# Altium PCB MR_TRANS.PcbDoc
Units mil, origin at the board's own origin, x right, y up, seen from the top; angles counter-clockwise.
Board outline 1582.71 x 1582.71 mil, 2 copper layers (Top Layer, Bottom Layer), stack 37.008 mil thick; 14 components, 9 nets, 68 pads, 20 vias.
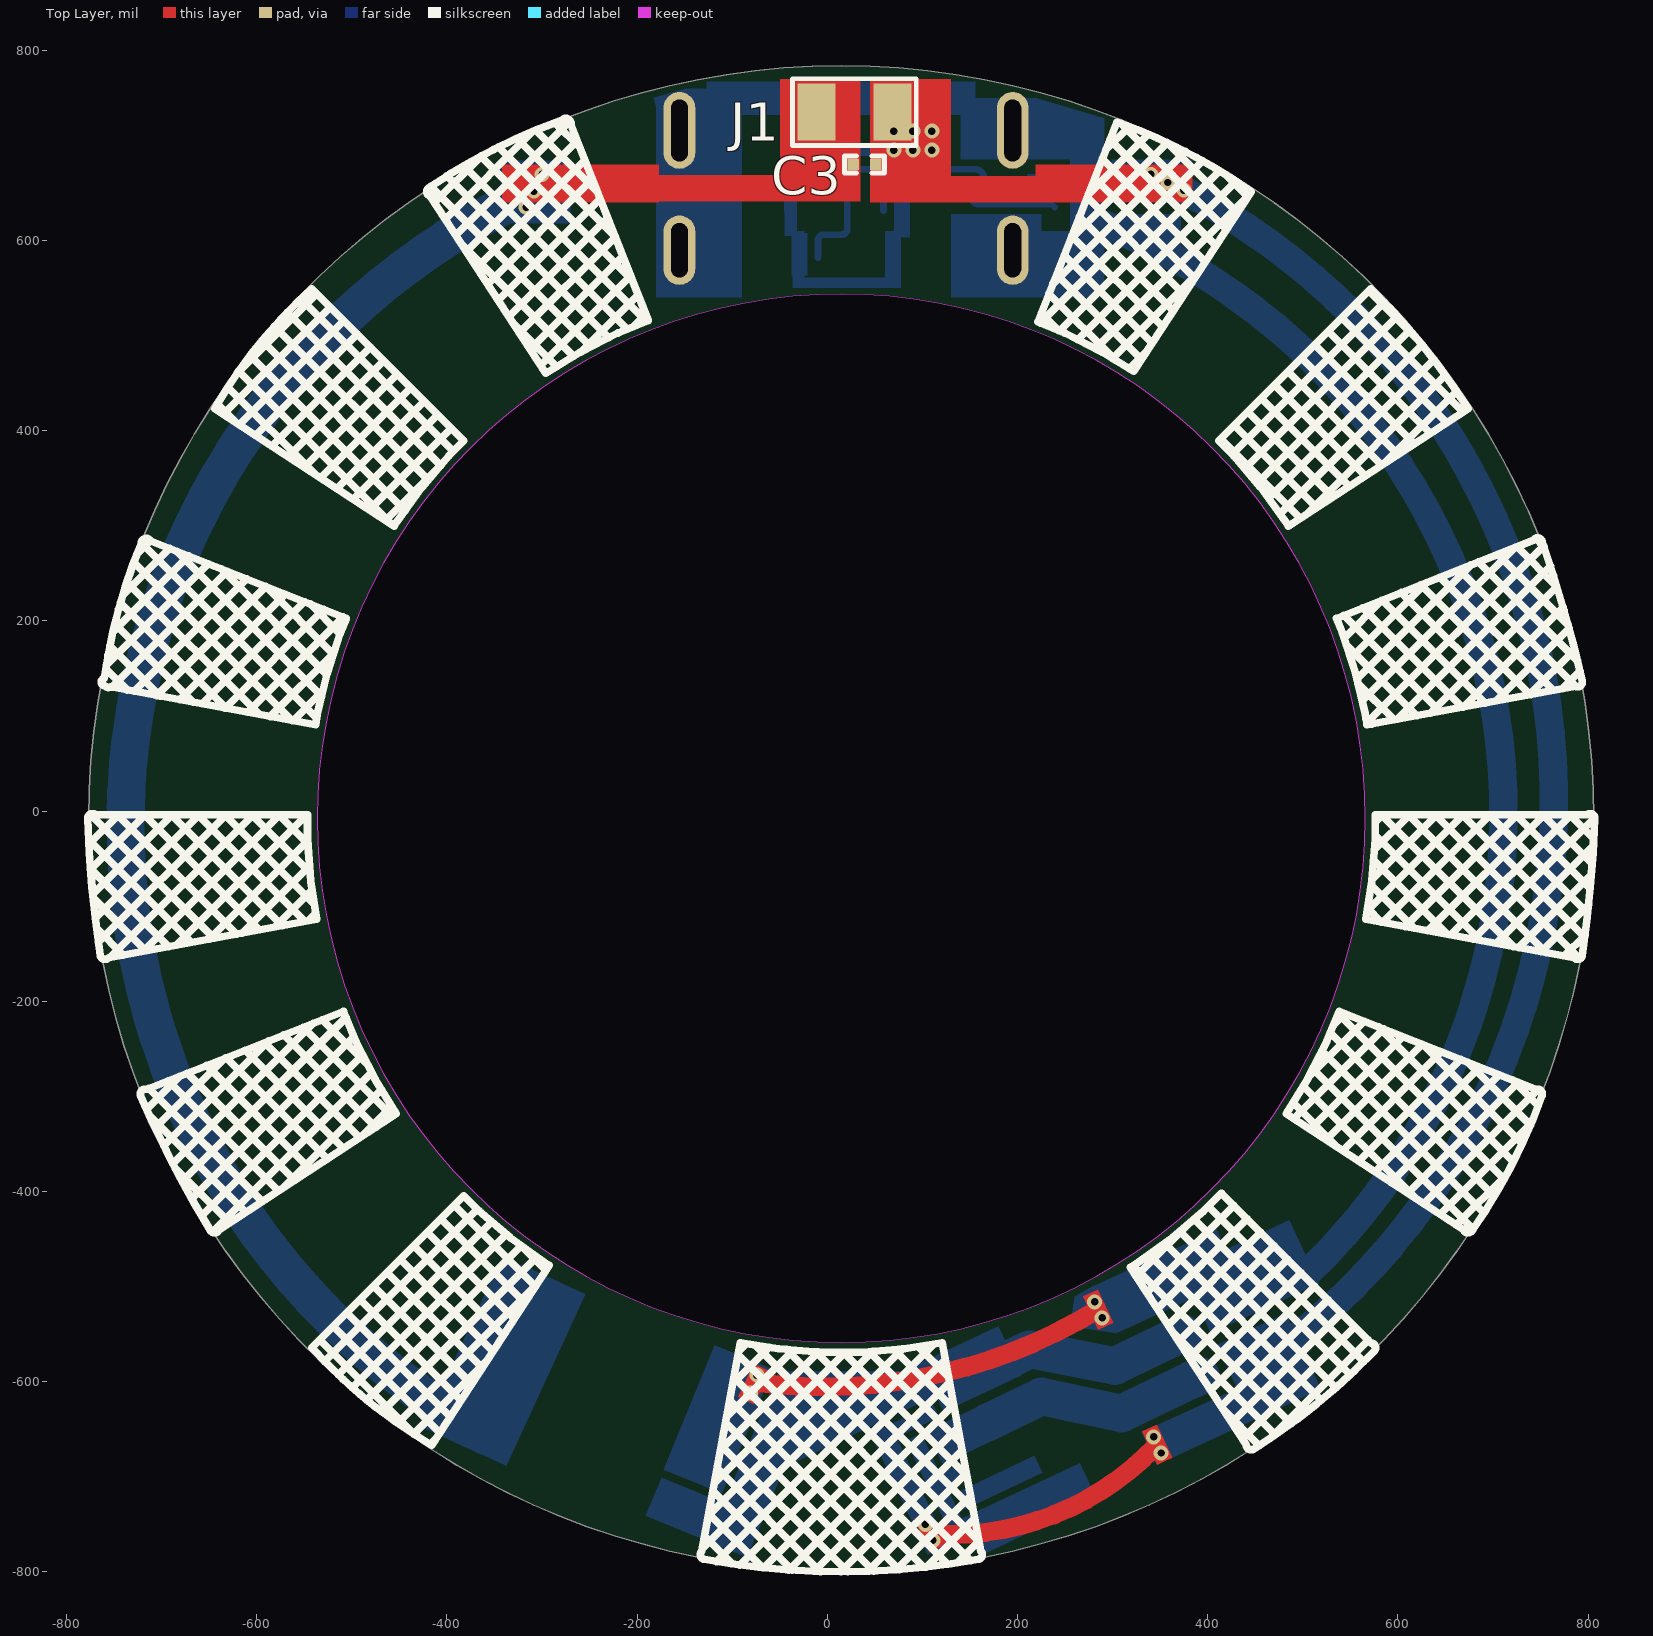
[diagram p0: Top Layer view]
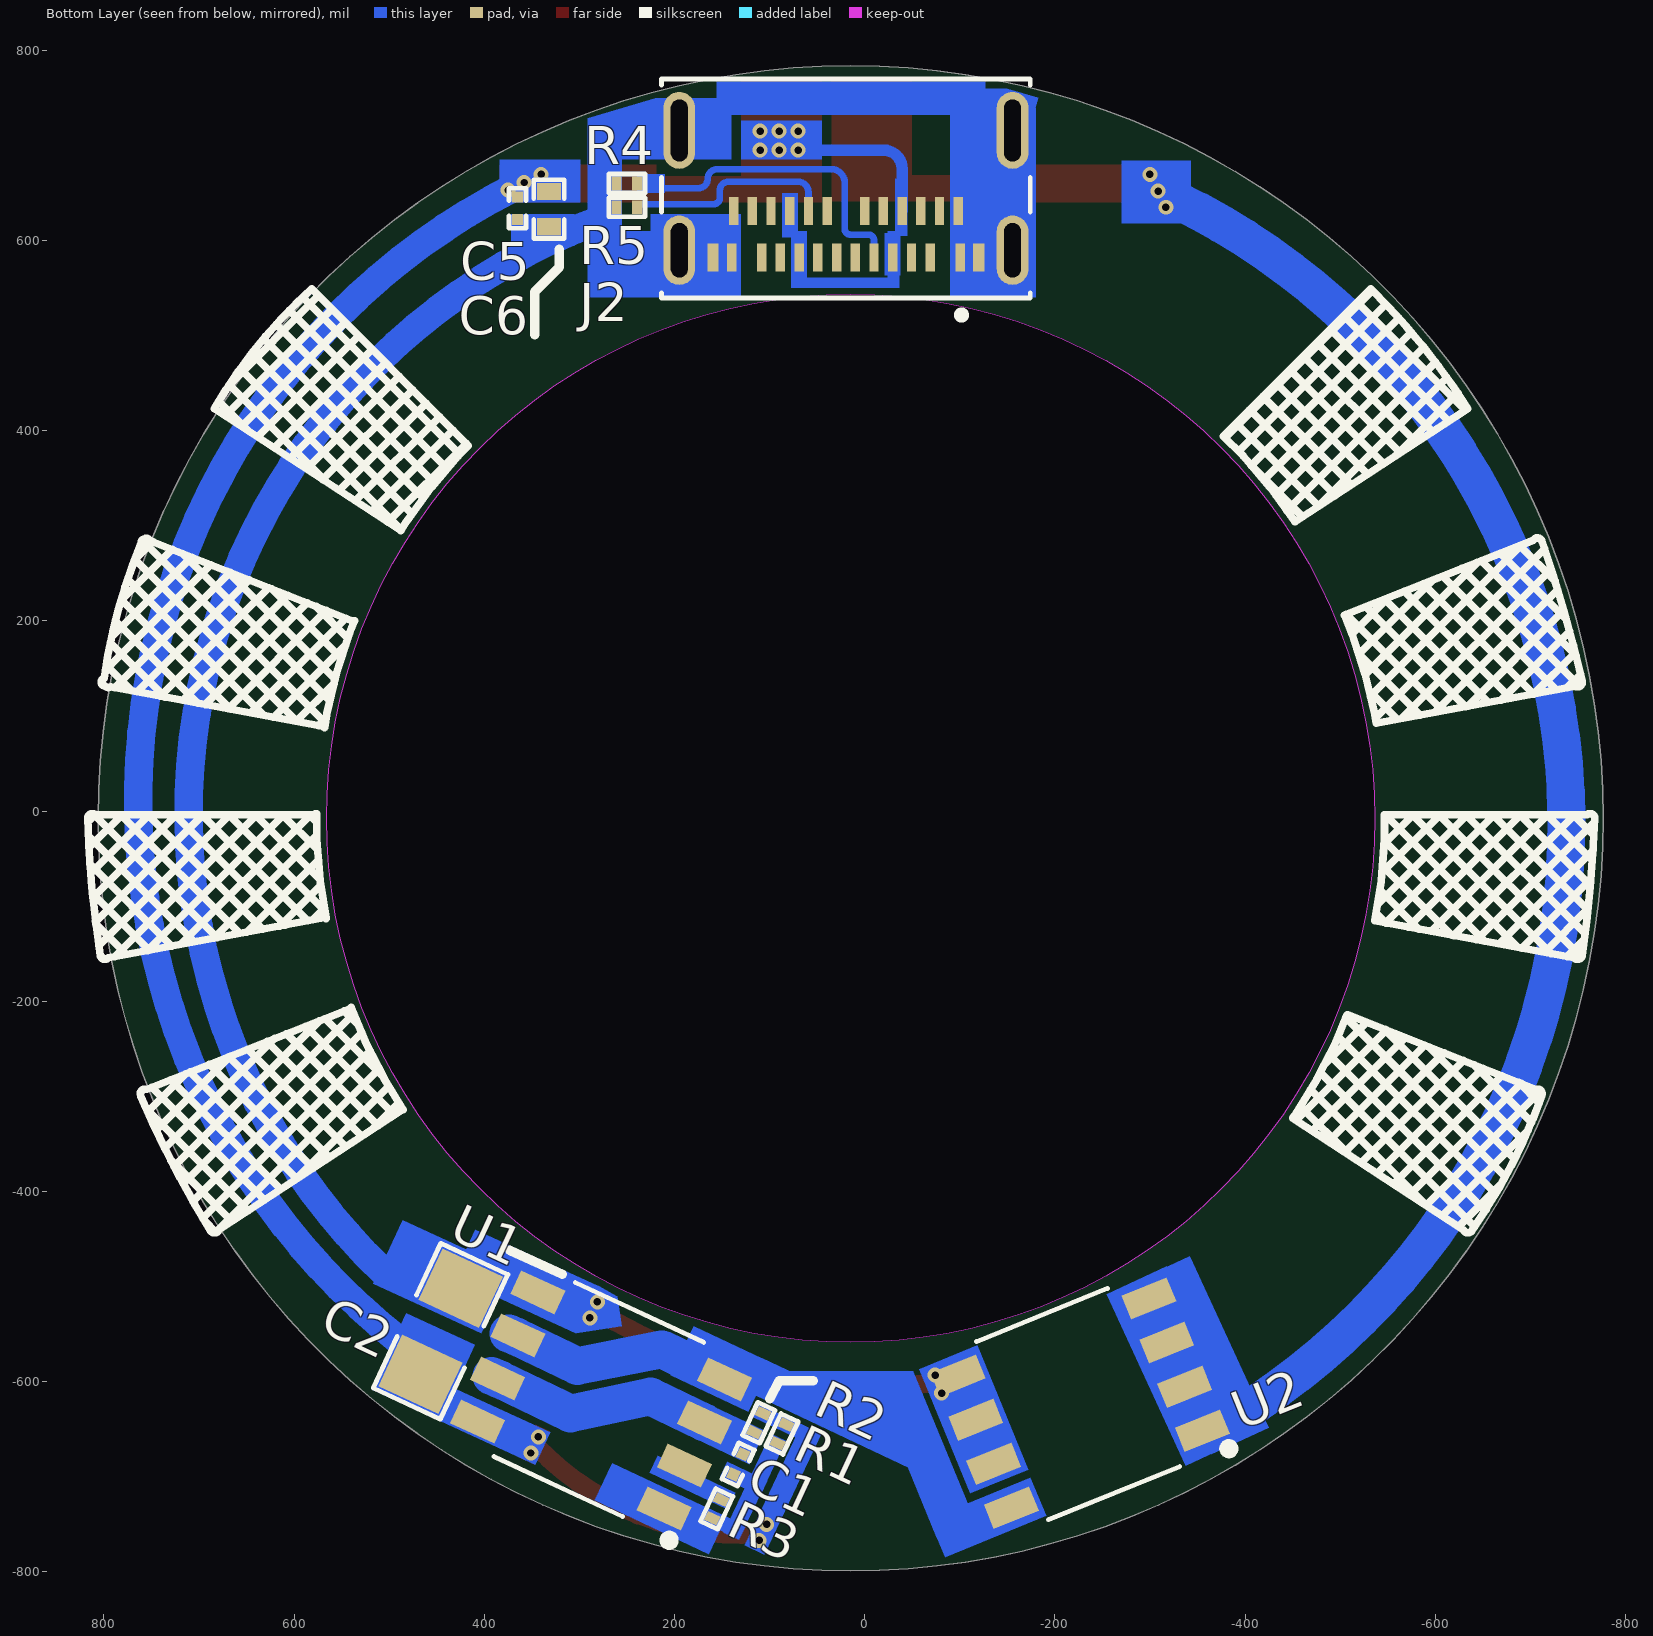
[diagram p1: Bottom Layer view, seen from below]
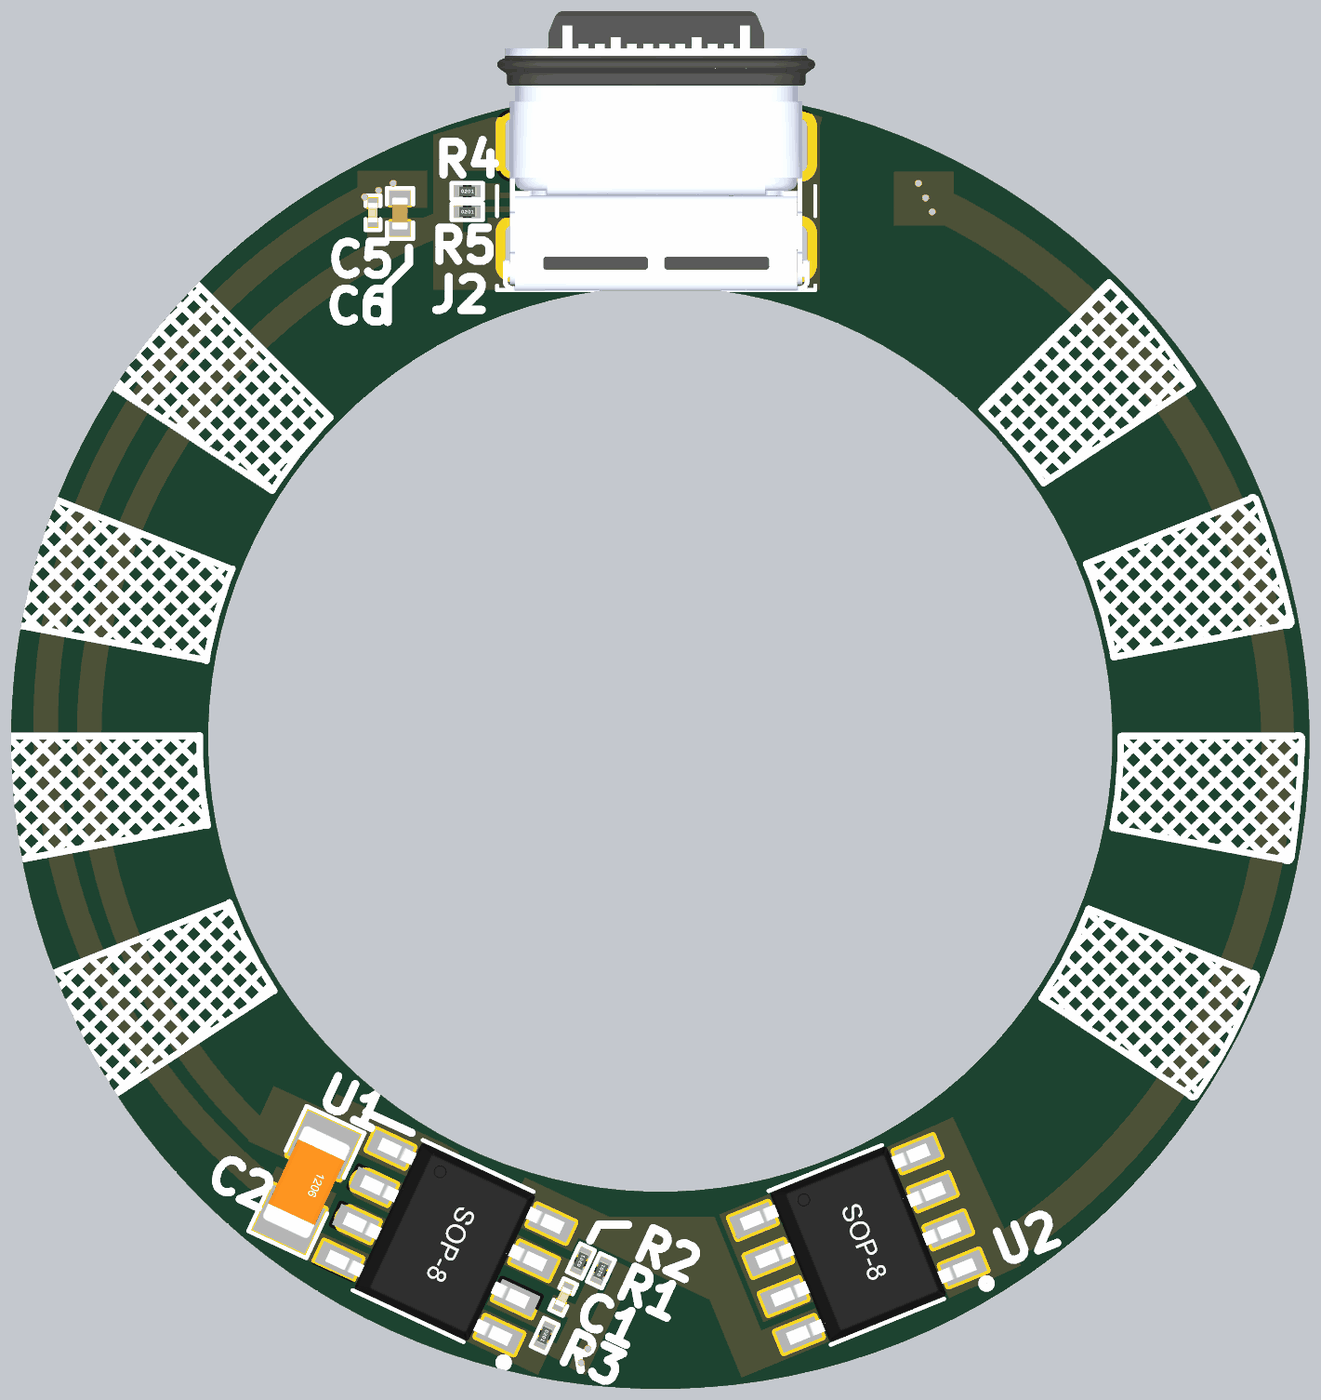
[diagram p2: 3D render of the assembled board from below, using the file's embedded part models]

## Layer stack, top to bottom
Top Solder: solder mask 1.1811, Solder Resist, Dk 3.5
Top Layer: signal copper 3.5433
Dielectric 1: dielectric 29.9213, FR-4, Dk 4.8
Bottom Layer: signal copper 3.5433
Bottom Solder: solder mask 1.1811, Solder Resist, Dk 3.5

## Board outline
-776.64,-7.6 ccw(c14.71,-7.6) 14.71,-798.95 ccw(c14.71,-7.6) 806.06,-7.6 ccw(c14.71,-7.6) 14.71,783.76 ccw(c14.71,-7.6)
cut-out: -536.47,-7.6 ccw(c14.71,-7.6) 14.71,-558.78 ccw(c14.71,-7.6) 565.89,-7.6 ccw(c14.71,-7.6) 14.71,543.58 ccw(c14.71,-7.6)

## Design rules (kind name [scope] priority, off if disabled: settings)
Clearance [All] p1: gap=6 ignorepadtopadclearanceinfootprint=FALSE
MinimumSolderMaskSliver [All] p1: minsoldermaskwidth=0
PolygonConnect [All] p1: connectstyle=Direct reliefconductorwidth=10 reliefentries=4 polygonreliefangle="90 Angle" airgapwidth=10
RoutingVias [All] p1: holewidth=7.87 width=15.75 viastyle="Through Hole" minholewidth=7.87 minwidth=15.75 maxholewidth=28 maxwidth=50
SilkToSilkClearance [All] p1: silktosilkclearance=0
SilkToSolderMaskClearance [IsPad] p1: minsilkscreentomaskgap=0 clearancetoexposedcopper=TRUE
SolderMaskExpansion [All] p1: expansion=4
Width [All] p1: maxlimit=40 minlimit=7 preferedwidth=10
27 further rules are at their usual default settings.

## Classes and differential pairs
component class "U_Wireless Transmitter Section": C1 C2 C3 R1 R2 R3 U1 U2
component class "U_Connector Section": C5 C6 J1 J2 R4 R5

## Components (designator, comment, footprint, x,y, rotation, side; value= is the part's Value field where it differs from the comment)
C1 "120pF" "CAP 0201" 133,-687 r295 bottom
C2 "47uF" Cap1206 446,-547 r295 bottom
C3 "15nF" "CAP 0201" 39,680 r180 top
C5 "0.1uF" "CAP 0201" 365,634 r270 bottom
C6 "1uF" Cap0402 332,633 r90 bottom
J1 "SMD PADS" "SMD PAD" 28.37,735 r180 top
J2 "2305018-2" 2305018-2 19.69,648.85 r0 bottom locked
R1 "47K" Res-0201 87,-655 r115 bottom
R2 "47K" Res-0201 111.42,-643.19 r115 bottom
R3 "9.1K" Res-0201 155.58,-733.81 r295 bottom
R4 "5.23k" Res-0201 250,660 r180 bottom
R5 "5.23k" Res-0201 250,635 r180 bottom
U1 "XKT-412" SOP-8 277.18,-619.78 r25 bottom locked value=Custom
U2 "XKT-335" SOP-8 -226.63,-622.59 r338 bottom value=Custom

## Footprints (in the part's own frame and the unit in brackets; to place one, negate y for a bottom-side part, rotate by r counter-clockwise, add the part's x,y. Pads: shape width x height; smd on the part's side, far side on the other; paste and mask are expansions set on the pad)
2305018-2 [mm] "CONN RCP USB3.1 TYPEC 24P SMD RA"
  rect 0.25x0.75 smd: A1(-3.05,1.7) A2(-2.25,1.7) A3(-1.75,1.7) A4(-1.25,1.7) A5(-0.75,1.7) A6(-0.25,1.7) A7(0.25,1.7) A8(0.75,1.7) A9(1.25,1.7) A10(1.75,1.7) A11(2.25,1.7) A12(3.05,1.7) B1(3,0.45) B2(2.5,0.45) B3(2,0.45) B4(1.5,0.45) B5(1,0.45) B6(0.5,0.45) B7(-0.5,0.45) B8(-1,0.45) B9(-1.5,0.45) B10(-2,0.45) B11(-2.5,0.45) B12(-3,0.45)
  rect 0.3x0.75 smd: G1(-3.55,1.7) G2(3.55,1.7)
  oval 0.85x2.05 hole 0.45 slot 1.65 at 90 deg: S1(-4.45,-1.7) S2(4.45,-1.7)
  oval 0.85x1.85 hole 0.45 slot 1.45 at 90 deg: S3(4.45,1.5) S4(-4.45,1.5)
  silkscreen extent -4.92,-3.07 4.92,3.33, body extent -4.92,-5.86 4.92,2.79, height 3.53
Cap0402 [mil]
  rect 18x25 smd mask+2.36: 1(-18.5,0) 2(18.5,0)
  silkscreen extent -31,-16 31,16, body extent -20,-10 20,10, height 19
Cap1206 [mil] "SMD 1206"
  rect 60x70 smd: 1(-50,0) 2(50,0)
  silkscreen extent -84,-39 84,39, body extent -63,-31 63,32, height 39
"CAP 0201" [mm]
  rect 0.3x0.3 smd mask+0.055: 1(-0.3,0) 2(0.3,0)
  silkscreen extent -0.53,-0.23 0.53,0.23, body extent -0.3,-0.15 0.3,0.15, height 0.28
Res-0201 [mm]
  rect 0.27x0.37 smd: 1(-0.275,0) 2(0.275,0)
  silkscreen extent -0.48,-0.25 0.48,0.25, body extent -0.3,-0.15 0.3,0.15, height 0.29
"SMD PAD" [mil] "SMD 0805"
  rect 40x60 smd: 1(-40,0) 2(40,0)
  silkscreen extent -65,-35 65,35
SOP-8 [mm]
  rect 1.3x0.7 smd: 1(-2.75,1.905) 2(-2.75,0.635) 3(-2.75,-0.635) 4(-2.75,-1.905) 5(2.75,-1.905) 6(2.75,-0.635) 7(2.75,0.635) 8(2.75,1.905)
  silkscreen extent -3.36,-2.57 1.96,2.75, body extent -3.11,-2.5 3.11,2.5, height 1.87

## Part data
C1: library part GRM0335C1H121JA01D, "CAP CER 120PF 50V C0G/NP0 0201", Case Code (Imperial)=0201, Case Code (Metric)=0603, Dielectric=C0G, MANUFACTURER=Murata, Max Operating Temperature=125°C, Min Operating Temperature=-55°C, Package Quantity=15000, Supplier Part Number 1=490-7221-1-ND, Tolerance=5%, Voltage Rating=50V, Capacitance=120pF, Case/Package=0201, Category="Ceramic Capacitors", ComponentLink1Description=https://datasheet.ciiva.com/18699/grm0335c1h121ja01-01-18699256.pdf?src-supplier=Digi-Key, ComponentLink1URL=https://datasheet.ciiva.com/18699/grm0335c1h121ja01-01-18699256.pdf?src-supplier=Digi-Key, ComponentLink2Description=https://datasheet.ciiva.com/24220/c02e-24220870.pdf?src-supplier=Mouser, ComponentLink2URL=https://datasheet.ciiva.com/24220/c02e-24220870.pdf?src-supplier=Mouser, ComponentLink3Description=https://datasheet.ciiva.com/18699/partnumbering-e-01-18699257.pdf?src-supplier=Digi-Key, ComponentLink3URL=https://datasheet.ciiva.com/18699/partnumbering-e-01-18699257.pdf?src-supplier=Digi-Key, ComponentLink4Description=https://datasheet.ciiva.com/18699/partnumbering-e-01-18699258.pdf?src-supplier=Digi-Key, ComponentLink4URL=https://datasheet.ciiva.com/18699/partnumbering-e-01-18699258.pdf?src-supplier=Digi-Key, Height=0.3mm, Lead Free="Lead Free", Length=0.024inch, Manufacturer Part Number=GRM0335C1H121JA01D, Mount="Surface Mount", Packaging="Tape and Reel", Pricing 1="1=0.10000, 10=0.02300, 50=0.01260, 100=0.01020, 500=0.00732, 1000=0.00575, 2500=0.00522, 5000=0.00481 (USD)", RoHS=Yes, RoHS Compliant=Yes, Stock 1=655537, Supplier 1=Digi-Key, Termination=SMD/SMT, Thickness=0.013inch, Voltage Rating (DC)=50V, Weight=1.2E-05oz, Width=0.3mm
C2: library part EMK316BBJ476ML-T, "CAP CER 47UF 16V X5R 1206", Case Code (Imperial)=1206, Case Code (Metric)=3216, MANUFACTURER="Taiyo Yuden", Max Operating Temperature=85°C, Min Operating Temperature=-55°C, Supplier Part Number 1=587-5425-1-ND, Tolerance=20%, Voltage Rating=16V, Capacitance=47uF, Case/Package=1206, Category="Ceramic Capacitors", ComponentLink1Description=http://www.farnell.com/datasheets/2819853.pdf?src-supplier=Farnell, ComponentLink1URL=http://www.farnell.com/datasheets/2819853.pdf?src-supplier=Farnell, ComponentLink2Description=http://ds.yuden.co.jp/TYCOMPAS/ut/detail.do?productNo=EMK316BBJ476ML-T&fileName=EMK316BBJ476ML-T_SS&mode=specSheetDownload&src-supplier=Digi-Key, ComponentLink2URL=http://ds.yuden.co.jp/TYCOMPAS/ut/detail.do?productNo=EMK316BBJ476ML-T&fileName=EMK316BBJ476ML-T_SS&mode=specSheetDownload&src-supplier=Digi-Key, ComponentLink3Description=http://www.farnell.com/datasheets/2819853.pdf?src-supplier=Element14, ComponentLink3URL=http://www.farnell.com/datasheets/2819853.pdf?src-supplier=Element14, ComponentLink4Description=http://www.farnell.com/datasheets/2819853.pdf?src-supplier=Newark, ComponentLink4URL=http://www.farnell.com/datasheets/2819853.pdf?src-supplier=Newark, Manufacturer Part Number=EMK316BBJ476ML-T, Mount="Surface Mount", Packaging="Tape and Reel", Pricing 1="1=0.70000, 10=0.51700, 50=0.41400, 100=0.35480, 500=0.28090, 1000=0.23654 (USD)", RoHS=Yes, RoHS Compliant=Yes, Stock 1=201307, Supplier 1=Digi-Key
C3: library part CC0201KRX7R8BB152, "CAP CER 1500PF 25V X7R 0201", Capacitance=1.5nF, Case/Package=0201, Case Code (Metric)=0603, Dielectric=X7R, MANUFACTURER=Yageo, Max Operating Temperature=125°C, Min Operating Temperature=-55°C, Supplier Part Number 1=311-1607-1-ND, Tolerance=10%, Voltage Rating=25V, Case Code (Imperial)=0201, Category="Ceramic Capacitors", ComponentLink1Description=http://www.yageo.com/documents/recent/UPY-GPHC_X7R_6.3V-to-50V_18.pdf?src-supplier=Digi-Key, ComponentLink1URL=http://www.yageo.com/documents/recent/UPY-GPHC_X7R_6.3V-to-50V_18.pdf?src-supplier=Digi-Key, Halogen Free="Halogen Free", Lead Free="Lead Free", Length=0.024inch, Manufacturer Part Number=CC0201KRX7R8BB152, Mount="Surface Mount", Packaging="Tape and Reel", Pricing 1="1=0.10000, 10=0.02400, 50=0.01320, 100=0.01080, 500=0.00770, 1000=0.00605, 2500=0.00550, 5000=0.00506 (USD)", RoHS=Yes, RoHS Compliant=Yes, Stock 1=17556, Supplier 1=Digi-Key, Thickness=0.013inch, Voltage Rating (DC)=25V, Width=0.012inch
C5: library part GRM033R6YA104ME14D, "CAP CER 0.1UF 35V X5R 0201", Capacitance=100nF, Case Code (Imperial)=0201, Case Code (Metric)=0603, Dielectric=X5R, MANUFACTURER=Murata, Max Operating Temperature=85°C, Min Operating Temperature=-55°C, Package Quantity=15000, Supplier Part Number 1=490-10431-1-ND, Tolerance=20%, Voltage Rating=35V, Case/Package=0201, Category="Ceramic Capacitors", ComponentLink1Description=http://www.mouser.com/ds/2/281/c02e-2905.pdf?src-supplier=Mouser, ComponentLink1URL=http://www.mouser.com/ds/2/281/c02e-2905.pdf?src-supplier=Mouser, ComponentLink2Description=http://search.murata.co.jp/Ceramy/image/img/A01X/G101/ENG/GRM033R6YA104ME14-01.pdf?src-supplier=Digi-Key, ComponentLink2URL=http://search.murata.co.jp/Ceramy/image/img/A01X/G101/ENG/GRM033R6YA104ME14-01.pdf?src-supplier=Digi-Key, Height=0.3mm, Length=0.024inch, Manufacturer Part Number=GRM033R6YA104ME14D, Mount="Surface Mount", Packaging="Tape and Reel", Pricing 1="1=0.10000, 10=0.05600, 50=0.03040, 100=0.02490, 500=0.01778, 1000=0.01398, 2500=0.01270, 5000=0.01169 (USD)", RoHS=Yes, Stock 1=49800, Supplier 1=Digi-Key, Termination=SMD/SMT, Thickness=0.013inch, Voltage Rating (DC)=35V, Weight=1.2E-05oz, Width=0.012inch
C6: library part CC0402KRX5R6BB105, "CAP CER 1UF 10V X5R 0402", Case Code (Imperial)=0402, Case Code (Metric)=1005, Dielectric=X5R, MANUFACTURER=Yageo, Max Operating Temperature=85°C, Min Operating Temperature=-55°C, Package Quantity=1, Resistor Type=Ceramic, Supplier Part Number 1=311-1439-1-ND, Tolerance=10%, Voltage Rating=10V, Capacitance=1uF, Case/Package=0402, Category="Ceramic Capacitors", ComponentLink1Description=https://datasheet.ciiva.com/176/upy-gphc-x5r-4v-to-50v-12-176704.pdf?src-supplier=Digi-Key, ComponentLink1URL=https://datasheet.ciiva.com/176/upy-gphc-x5r-4v-to-50v-12-176704.pdf?src-supplier=Digi-Key, ComponentLink2Description=https://datasheet.ciiva.com/176/mlccorderingcode-176705.pdf?src-supplier=Digi-Key, ComponentLink2URL=https://datasheet.ciiva.com/176/mlccorderingcode-176705.pdf?src-supplier=Digi-Key, ComponentLink3Description=https://datasheet.ciiva.com/176/mlccorderingcode-176706.pdf?src-supplier=Digi-Key, ComponentLink3URL=https://datasheet.ciiva.com/176/mlccorderingcode-176706.pdf?src-supplier=Digi-Key, Construction=Flat, Depth=0.5mm, Dissipation Factor=15%, Halogen Free="Halogen Free", Height=0.5mm, Lead Free="Lead Free", Length=1mm, Manufacturer Part Number=CC0402KRX5R6BB105, Mount="Surface Mount", Number of Pins=2, Packaging="Tape and Reel", Pricing 1="1=0.11000, 10=0.08000, 50=0.04560, 100=0.03770, 500=0.02644, 1000=0.02189, 2500=0.02037, 5000=0.01864 (USD)", Radiation Hardening=No, REACH SVHC="No SVHC", RoHS=Yes, RoHS Compliant=Yes, Series=CC, Stock 1=3784314, Supplier 1=Digi-Key, Termination=SMD/SMT, Thickness=0.022inch, Voltage Rating (DC)=10V, Width=0.02inch
J1: library part "SMD PAD"
J2: "CONN RCP USB3.1 TYPEC 24P SMD RA"
R1 R2: library part ERJ-1GNJ473C, "RES SMD 47K OHM 5% 1/20W 0201", Case Code (Imperial)=0201, Case Code (Metric)=0603, MANUFACTURER=Panasonic, Max Operating Temperature=125°C, Max Power Dissipation=50mW, Min Operating Temperature=-55°C, Package Quantity=15000, Resistance=47kR, Resistor Type="Thick Film", Supplier Part Number 1=P123333CT-ND, Temperature Coefficient=200ppm/°C, Tolerance=5%, Voltage Rating=25V, Case/Package=0201, Category="Chip SMD Resistors", ComponentLink1Description=https://datasheet.ciiva.com/24066/aoa0000ce1-37422-24066854.pdf?src-supplier=Mouser, ComponentLink1URL=https://datasheet.ciiva.com/24066/aoa0000ce1-37422-24066854.pdf?src-supplier=Mouser, Height=0.01inch, Length=0.024inch, Manufacturer Part Number=ERJ-1GNJ473C, Mount="Surface Mount", Number of Terminations=2, Packaging="Tape and Reel", Power Rating=50mW, Pricing 1="1=0.10000, 10=0.02500, 100=0.01000, 1000=0.00450, 2500=0.00391, 5000=0.00323 (USD)", RoHS=Yes, RoHS Compliant=Yes, Stock 1=79259, Supplier 1=Digi-Key, Termination=SMD/SMT, Width=0.3mm
R3: library part RC0201JR-079K1L, "RES SMD 9.1K OHM 5% 1/20W 0201", Case/Package=0201, Case Code (Metric)=0603, MANUFACTURER=Yageo, Max Operating Temperature=125°C, Max Power Dissipation=50mW, Min Operating Temperature=-55°C, Resistance=9.1kR, Resistor Type="Thick Film", Supplier Part Number 1=YAG2941CT-ND, Temperature Coefficient=200ppm/°C, Tolerance=5%, Working Voltage=25V, Case Code (Imperial)=0201, Category="Chip SMD Resistors", ComponentLink1Description=http://www.yageo.com/documents/recent/PYu-RC_Group_51_RoHS_L_9.pdf?src-supplier=Digi-Key, ComponentLink1URL=http://www.yageo.com/documents/recent/PYu-RC_Group_51_RoHS_L_9.pdf?src-supplier=Digi-Key, ComponentLink2Description=http://www.yageo.com.tw/exep/pages/download/literatures/PYu-R_INT-thick_7.pdf?src-supplier=Digi-Key, ComponentLink2URL=http://www.yageo.com.tw/exep/pages/download/literatures/PYu-R_INT-thick_7.pdf?src-supplier=Digi-Key, ComponentLink3Description=http://www.yageo.com/documents/recent/PYu-RC_Group_51_RoHS_L_8.pdf?src-supplier=Future+Electronics, ComponentLink3URL=http://www.yageo.com/documents/recent/PYu-RC_Group_51_RoHS_L_8.pdf?src-supplier=Future+Electronics, Features="Moisture Resistant", Height=0.01inch, Lead Free="Lead Free", Length=0.024inch, Manufacturer Part Number=RC0201JR-079K1L, Number of Terminations=2, Packaging="Tape and Reel", Power Rating=50mW, Pricing 1="1=0.10000, 10=0.02800, 100=0.01140, 1000=0.00513, 2500=0.00445, 5000=0.00368 (USD)", RoHS=Yes, Stock 1=4033, Supplier 1=Digi-Key, Width=0.012inch
R4 R5: library part RTT015231FTH, "5.23kO ±1% 0.05W 0201 Chip Resistor - Surface Mount RoHS", MANUFACTURER=Ralec, Package=0201, Manufacturer Part No=RTT015231FTH
U1: "1.5AUSB power chip wireless wireless charging power", MANUFACTURER=ReYeBu, Package=SOP-8, Manufacturer Part No=XKT-412
U2: "high current wireless power charging power wireless IC chip", MANUFACTURER=ReYeBu, Manufacturer Part No=XKT-335, Pakage=SOP-8

## Via types
v1: diameter 15.75, hole 7.87, Top Layer to Bottom Layer, tented both sides, 20 vias

## Nets (pads, with @x,y where several pads share a name; then routed paths per layer and width w, separated by ;. In a path a pad name is that pad's centre, name@x,y a point inside that pad or via, vN(x,y) a via of type N, cw(c..) or ccw(c..) an arc to the next point about the centre after c; other vN are vias at no path point)
12V: C2.2 C3.1 C5.1 C6.2 J1.1 J2.A4 J2.A9 J2.B4 J2.B9 R1.2 R2.2 U1.8 | length 1980.1
  Top Layer w20: v1@110.92,-760.4 ccw(c127.96,-460.44) 345.11,-668.06
  Bottom Layer w12: J2.B9 -39.37,675.63 cw(c-20,675.63) -20,695 v1(90,695) ccw(c90,710) v1@105,710
  Bottom Layer w30: v1(340.3,669.67) cw(c40,10.87) C2.2@464,-576
  other v1: 111,-767 103,-750 351,-675 343,-658 375,653 358,661 70,695 110,695 70,715 90,715 110,715
CC1: J2.A5 R4.2 | length 329.4
  Bottom Layer w7: J2.A5 -9.84,600.16 cw(c-3.82,600.16) -3.82,606.18 15,606.18 ccw(c15,612.21) 21.02,612.21 21.02,661.02 cw(c35,661.02) 35,675 155,675 cw(c155,665) 165,665 ccw(c175,665) 175,655 219.17,655 224.17,660
CC2: J2.B5 R5.2 | length 224.2
  Bottom Layer w7: J2.B5 59.06,650.87 cw(c70,650.87) 70,661.81 143.19,661.81 cw(c143.19,652.78) 152.22,652.78 152.22,645 ccw(c159.03,645) 159.03,638.19 235.98,638.19 R5.2
FT: R3.1 U1.2
GND: C2.1 C5.2 C6.1 J2.A1 J2.A12 J2.B1 J2.B12 J2.G1 J2.G2 J2.S1 J2.S2 J2.S3 J2.S4 R4.1 R5.1 U1.5 U2.5 U2.6 U2.7 | length 1722.1
  Top Layer w20: -75,-601 ccw(c-4.34,-52.66) 283,-525
  Bottom Layer w30: 278,622 cw(c43.27,-3.11) 504.24,-486.2
  other v1: -81,-612 -74,-593 289,-533 281,-516
IND: C3.2 J1.2 U2.1 U2.2 U2.3 U2.4 | length 1602.3
  Bottom Layer w40: -384.43,-640.68 cw(c-6.58,-14.35) -297,657
  other v1: -316.67,634.97 -308.67,651.97 -300,669.67
OUT: U1.4 U1.6 U2.8 | length 246
  Bottom Layer w40: U1.4 213,-566 302.05,-583.57 365.54,-553.03 U1.6@367.69,-552 ; U1.6@365.41,-552.96 U1.6@374.25,-549.23
TD: C1.1 R2.1 U1.3 U1.7 | length 241.1
  Bottom Layer w40: U1.3 225.31,-615.56 309.25,-633.53 U1.7@383.72,-597.72 ; U1.7@383.59,-597.65 U1.7 U1.7@392.43,-593.91
VD: C1.2 R1.1 R3.2 U1.1
pads on no net: J2.A2 J2.A3 J2.A6 J2.A7 J2.A8 J2.A10 J2.A11 J2.B2 J2.B3 J2.B6 J2.B7 J2.B8 J2.B10 J2.B11

## Polygon pours and split planes (outlines as drawn)
no net on Top Layer "Top Layer-No Net" (solid, pour order 3): -327,702
no net on Top Overlay (hatched 45Degree grid 20 track 8): -644.34,423.28 -446.63,294.01 cw(c-57.43,51) -375.04,382.14 -542.07,549.18 ccw(c-191.53,159.94)
no net on Top Overlay (hatched 45Degree grid 20 track 8): 217.59,504.88 cw(c116.04,188) 316.32,453.74 445.58,651.45 ccw(c111.16,178.58) 304.55,724.52
no net on Top Overlay (hatched 45Degree grid 20 track 8): 404.45,382.15 cw(c202.64,145.06) 476.04,294.01 673.76,423.28 ccw(c77.35,43.29) 571.48,549.18
no net on Top Overlay (hatched 45Degree grid 20 track 8): 541.16,92.92 ccw(c400.61,118.75) 543.52,118.75 ccw(c400.61,118.75) 522.9,192.7 cw(c527.19,195.29) 528.61,200.1 742.5,284.78 cw(c746.82,282.24) 751.56,283.88 cw(c-604.69,-185.69) 793.85,136.8 cw(c788.97,135.68) 793.98,135.68 cw(c788.97,135.68) 786.65,131.23 557.41,88.81 cw(c556.69,92.69) 554.33,89.52 549.85,88.69 cw(c546.1,92.02)
no net on Top Overlay (hatched 45Degree grid 20 track 8): 551.82,-106.69 ccw(c556.69,-107.89) 559.01,-112.34 785.21,-154.2 ccw(c788.97,-150.87) 793.93,-151.57 ccw(c-709.99,58.89) 807.12,-7.82 ccw(c802.11,-7.6) 807.13,-7.6 ccw(c802.11,-7.6) 799.02,-3.65 568.98,-3.65 ccw(c565.89,-7.6) 560.88,-7.9 cw(c231.89,-27.52) 561.47,-27.52 cw(c231.89,-27.52)
no net on Top Overlay (hatched 45Degree grid 20 track 8): 476.47,-314.21 cw(c476.05,-309.21) 471.93,-306.35 ccw(c123.7,-64.06) 522.48,-208.77 cw(c527.19,-210.48) 531.52,-207.95 745.41,-292.62 cw(c746.83,-297.43) 751.84,-297.43 cw(c746.83,-297.43) 751.54,-299.14 cw(c173.93,-90.08) 677.87,-441.34 cw(c673.76,-438.47) 669.01,-440.09
no net on Top Overlay (hatched 45Degree grid 20 track 8): 314.7,-473.68 cw(c316.32,-468.93) 313.88,-464.55 ccw(c156.75,-182.46) 400.67,-394.05 cw(c404.45,-397.34) 409.43,-396.73 572.1,-559.4 cw(c571.49,-564.37) 576.5,-564.37 cw(c571.49,-564.37) 575.1,-567.86 cw(c86.18,-95.59) 448.25,-670.89 cw(c445.58,-666.65) 440.59,-666.23
no net on Top Overlay (hatched 45Degree grid 20 track 8): -129.48,-786.79 cw(c-128.56,-781.86) -131.89,-778.1 -90.03,-551.9 cw(c-85.58,-549.58) -84.67,-544.65 ccw(c14.71,-7.59) 114.09,-544.65 cw(c115,-549.58) 120.02,-549.58 cw(c115,-549.58) 119.45,-551.89 161.31,-778.1 cw(c157.98,-781.86) 163,-781.86 cw(c157.98,-781.86) 158.9,-786.79 cw(c14.71,-7.6)
no net on Top Overlay (hatched 45Degree grid 20 track 8): -542.07,-564.38 ccw(c-140.12,-198.2) -416.16,-666.65 -286.9,-468.93 cw(c-68.35,-109.85) -375.03,-397.34
no net on Top Overlay (hatched 45Degree grid 20 track 8): -648.62,-441.09 cw(c295.64,137.94) -722.01,-299.42 cw(c-717.41,-297.44) -715.99,-292.63 -502.1,-207.95 cw(c-497.77,-210.49) -493.04,-208.83 ccw(c-125.62,-80.3) -442.54,-306.3 cw(c-446.63,-309.21) -441.61,-309.21 cw(c-446.63,-309.21) -447.05,-314.21 -639.6,-440.09 cw(c-644.34,-438.47)
no net on Top Overlay (hatched 45Degree grid 20 track 8): -764.51,-151.63 ccw(c-759.55,-150.87) -755.79,-154.2 -529.59,-112.34 ccw(c-527.27,-107.89) -522.26,-107.89 ccw(c-527.27,-107.89) -522.38,-106.78 cw(c-153.96,-23.07) -531.46,-7.8 ccw(c-536.47,-7.6) -531.46,-7.6 ccw(c-536.47,-7.6) -539.56,-3.65 -769.61,-3.65 ccw(c-772.69,-7.6) -777.71,-7.76 ccw(c444.21,31.81)
no net on Top Overlay (hatched 45Degree grid 20 track 8): -760.27,131.79 -759.66,131.68 ccw(c-755.9,135) -753.58,130.55 -531.03,89.37 ccw(c-527.27,92.69) -522.28,92.2 cw(c-233.15,63.67) -493.28,193.05 ccw(c-497.77,195.29) -492.76,195.29 ccw(c-497.77,195.29) -499.19,200.1 -711.67,284.22 ccw(c-716,281.68) -718.47,286.04 ccw(c-717.41,282.24) -721.35,281.9 ccw(c-186.05,58.75) -760.34,139.55 ccw(c-759.55,135.67)
no net on Top Overlay (hatched 45Degree grid 20 track 8): -291.9,454.16 ccw(c-286.9,453.74) -284.16,449.54 cw(c14.71,-7.59) -186.33,500.22 ccw(c-188.18,504.88) -183.16,504.88 ccw(c-188.18,504.88) -185.64,509.21 -269.72,721.58 ccw(c-274.53,723) -269.52,723 ccw(c-274.53,723) -272.8,727.71 ccw(c-275.13,724.52) -278.19,727.02 ccw(c-63.59,129.46) -418.97,655.61 ccw(c-416.17,651.45) -417.78,646.71
no net on Bottom Overlay (hatched 45Degree grid 20 track 8): 799.64,131.79 799.03,131.68 cw(c795.27,135) 792.95,130.55 570.4,89.37 cw(c566.64,92.69) 561.65,92.2 ccw(c272.52,63.67) 532.65,193.05 cw(c537.14,195.29) 532.13,195.29 cw(c537.14,195.29) 538.56,200.1 751.04,284.22 cw(c755.37,281.68) 757.84,286.04 cw(c756.78,282.24) 760.72,281.9 cw(c225.42,58.75) 799.71,139.55 cw(c798.92,135.67)
no net on Bottom Overlay (hatched 45Degree grid 20 track 8): 803.88,-151.63 cw(c798.92,-150.87) 795.16,-154.2 568.96,-112.34 cw(c566.64,-107.89) 561.63,-107.89 cw(c566.64,-107.89) 561.75,-106.78 ccw(c193.33,-23.07) 570.83,-7.8 cw(c575.84,-7.6) 570.83,-7.6 cw(c575.84,-7.6) 578.93,-3.65 808.98,-3.65 cw(c812.06,-7.6) 817.08,-7.76 cw(c-404.84,31.81)
no net on Bottom Overlay (hatched 45Degree grid 20 track 8): 687.99,-441.09 ccw(c-256.27,137.94) 761.38,-299.42 ccw(c756.78,-297.44) 755.36,-292.63 541.47,-207.95 ccw(c537.14,-210.49) 532.41,-208.83 cw(c164.99,-80.3) 481.91,-306.3 ccw(c486,-309.21) 480.98,-309.21 ccw(c486,-309.21) 486.42,-314.21 678.97,-440.09 ccw(c683.71,-438.47)
no net on Bottom Overlay (hatched 45Degree grid 20 track 8): -437.1,-314.21 ccw(c-436.67,-309.21) -432.56,-306.35 cw(c-84.33,-64.06) -483.11,-208.77 ccw(c-487.82,-210.48) -492.15,-207.95 -706.04,-292.62 ccw(c-707.46,-297.43) -712.47,-297.43 ccw(c-707.46,-297.43) -712.17,-299.14 ccw(c-134.56,-90.08) -638.5,-441.34 ccw(c-634.39,-438.47) -629.64,-440.09
no net on Bottom Overlay (hatched 45Degree grid 20 track 8): -512.45,-106.69 cw(c-517.32,-107.89) -519.64,-112.34 -745.84,-154.2 cw(c-749.6,-150.87) -754.56,-151.57 cw(c749.36,58.89) -767.75,-7.82 cw(c-762.74,-7.6) -767.76,-7.6 cw(c-762.74,-7.6) -759.65,-3.65 -529.61,-3.65 cw(c-526.52,-7.6) -521.51,-7.9 ccw(c-192.52,-27.52) -522.1,-27.52 ccw(c-192.52,-27.52)
no net on Bottom Overlay (hatched 45Degree grid 20 track 8): -501.79,92.92 cw(c-361.23,118.75) -504.15,118.75 cw(c-361.23,118.75) -483.53,192.7 ccw(c-487.82,195.29) -489.24,200.1 -703.13,284.78 ccw(c-707.45,282.24) -712.19,283.88 ccw(c644.06,-185.69) -754.48,136.8 ccw(c-749.6,135.68) -754.61,135.68 ccw(c-749.6,135.68) -747.28,131.23 -518.04,88.81 ccw(c-517.32,92.69) -514.96,89.52 -510.48,88.69 ccw(c-506.73,92.02)
no net on Bottom Overlay (hatched 45Degree grid 20 track 8): -365.08,382.15 ccw(c-163.26,145.06) -436.67,294.01 -634.39,423.28 cw(c-37.98,43.29) -532.11,549.18
no net on Bottom Overlay (hatched 45Degree grid 20 track 8): 683.71,423.28 486,294.01 ccw(c96.8,51) 414.41,382.14 581.44,549.18 cw(c230.9,159.94)

## Other copper
Top Layer:
  region net IND: -177,680 -342,680 -342,640 -177,640
  region net IND: 35,669 -306,669 -306,641 35,641
  rectangle net 12V: 219,649 384,680
  rectangle net 12V: 112,640 384,668
  region net GND: -94.22,-616.19 -77.03,-624.28 -60.44,-589.03 -77.63,-580.94
  region net GND: 284.98,-545.55 300.88,-538.33 284.74,-502.82 268.84,-510.05
  region net 12V: 106.98,-779.55 122.88,-772.33 106.74,-736.82 90.84,-744.05
  region net 12V: 346.98,-687.55 362.88,-680.33 346.74,-644.82 330.84,-652.05
  rectangle net IND: -50,653 35,770
  rectangle net 12V: 45,640 130,770
Bottom Layer:
  rectangle net IND: -343,618 -270,684
  rectangle net GND: 305,594 372,628
  rectangle net 12V: 299,640 384,685
  rectangle net GND: -127,732 156,767
  rectangle net OUT: -34,-646 17,-610
  rectangle net OUT: -51.41,-620 99,-589
  region net OUT: -51.41,-589.08 -116.57,-747.53 -75.81,-764.3 -10.65,-605.85
  region net GND: -57.08,-586.54 -118.34,-561.35 -172.3,-692.54 -111.03,-717.73
  region net OUT: -67.62,-744.39 -174.54,-700.43 -191.3,-741.19 -84.39,-785.16
  region net GND: 260.26,-509.81 275.66,-538.04 295.84,-527.04 280.45,-498.8
  region net GND: 303.69,-549.49 308.67,-517.72 260.08,-510.09 255.09,-541.86
  region net 12V: 45.39,-654.46 105.61,-782.14 126.36,-772.36 66.13,-644.67
  region net 12V: 52.08,-668.64 117.64,-637.72 110.95,-623.53 45.39,-654.46
  region net OUT: -56.22,-695.44 124.31,-610.29 107.59,-574.85 -72.94,-660.01
  region net OUT: 122.32,-631.96 204.31,-593.29 179.74,-541.21 97.76,-579.89
  region net VD: 148.62,-758.98 119.61,-697.48 103.25,-705.2 132.26,-766.7
  region net VD: 131.76,-766.28 174.59,-746.08 167.63,-731.32 124.8,-751.53
  region net VD: 109.6,-720.36 152.43,-700.16 144.72,-683.8 101.88,-704
  region net VD: 126.46,-713.06 98.76,-654.34 82.4,-662.06 110.1,-720.78
  region net TD: 121.32,-686.96 203.31,-648.29 186.59,-612.85 104.61,-651.52
  region net FT: 144.31,-734.66 226.3,-695.99 217.71,-677.79 135.73,-716.47
  region net VD: 163.8,-781.87 284.28,-725.04 265.48,-685.17 145,-742
  region net 12V: 346.16,-687.44 519.15,-608.13 503.42,-573.83 330.44,-653.15
  region net 12V: 445.52,-639.89 518.53,-606.42 482.43,-527.67 409.42,-561.15
  region net GND: 303.69,-549.49 432.61,-490.38 409.37,-439.7 280.45,-498.8
  region net GND: 403.26,-549.26 516.89,-497.17 486.05,-429.9 372.42,-482
  region net IND: -425.19,-648.59 -364.46,-676.51 -281.33,-495.7 -342.06,-467.78
  region net IND: -400.96,-659.32 -337.46,-688.51 -254.33,-507.7 -317.83,-478.51
  region net 12V: -20.79,608.05 -37.79,608.05 -37.79,563.05 -20.79,563.05
  region net 12V: 77.64,610 60.64,610 60.64,550 77.64,550
  rectangle net GND: 130,587 225,628
  rectangle net 12V: 45,685 130,726
  rectangle net GND: -180,540 -135.61,740
  region net GND: -150,760 -183.03,750.25 -176.95,729.68 -143.93,739.42
  rectangle net GND: -150,540 -90,760
  region net GND: 214.19,730.31 285.46,709.28 291.27,728.97 220,750
  region net GND: 211.62,721.02 284.78,703.36 290,725 216.84,742.66
  region net GND: 206.75,728.8 272.37,687.79 285.62,708.99 220,750
  rectangle net GND: 140,685 220,750
  rectangle net GND: 170,685 291.27,728.97
  rectangle net GND: 255,540 291.27,687.79
  rectangle net GND: 130,540 290,610
  rectangle net 12V: -45,605 -32.11,665
  region net 12V: -23.9,610 -45,610 -45,605 -23.9,605
  rectangle net 12V: 62,603 87,610
  rectangle net 12V: -35,550 74.53,561
  rectangle net CC1: 210,650 239.17,670
  region net 12V: -23.9,608.05 -36.79,608.05 -36.79,550 -23.9,550
  region net 12V: 74.53,598 61.64,598 61.64,550 74.53,550
  rectangle net 12V: 70,605 87,650

## Silkscreen, mask and mechanical layers (free items; w line width, h text height)
Bottom Overlay:
  lines w10: 54,-599 90,-599 100,-618 ; 318,-487 373,-462 ; 321,591 321,572 347,546 347,501
Mechanical 1:
  circle w7.87: c14.71,-7.6 r669.29
  circle w7.87: c14.71,-7.6 r669.29
  lines w7.87: 546.1,92.02 778.37,135 ; 556.69,92.69 788.97,135.68 ; -772.69,-7.6 -536.47,-7.6 -772.69,-7.6 ; -759.55,-150.87 -527.27,-107.89 -759.55,-150.87 ; -759.55,135.67 -527.27,92.69 -759.55,135.67 ; -717.41,-297.44 -497.77,-210.49 -717.41,-297.44 ; -717.41,282.24 -497.77,195.29 -717.41,282.24 ; -644.34,-438.47 -446.63,-309.21 -644.34,-438.47 ; -644.34,423.28 -446.63,294.01 -644.34,423.28 ; -542.07,-564.38 -375.03,-397.34 -542.07,-564.38 ; -542.07,549.18 -375.04,382.14 -542.07,549.18 ; -416.16,-666.65 -286.9,-468.93 -416.16,-666.65 ; -416.17,651.45 -286.9,453.74 -416.17,651.45 ; -275.13,-739.72 -188.18,-520.08 -275.13,-739.72 ; -275.13,724.52 -188.18,504.88 -275.13,724.52 ; -128.56,-781.86 -85.58,-549.58 -128.56,-781.86 ; -128.57,766.66 -85.58,534.38 -128.57,766.66 ; 14.71,-795 14.71,-558.78 14.71,-795 ; 14.71,543.58 14.71,779.8 14.71,543.58 ; 115,-549.58 157.98,-781.86 115,-549.58 ; 115,534.38 157.98,766.66 115,534.38 ; 217.6,-520.08 304.55,-739.71 217.6,-520.08 ; 217.59,504.88 304.55,724.52 217.59,504.88 ; 316.32,-468.93 445.58,-666.65 316.32,-468.93 ; 316.32,453.74 445.58,651.45 316.32,453.74 ; 404.45,-397.34 571.49,-564.37 404.45,-397.34 ; 404.45,382.15 571.48,549.18 404.45,382.15 ; 476.05,-309.21 673.76,-438.47 476.05,-309.21 ; 476.04,294.01 673.76,423.28 476.04,294.01 ; 527.19,-210.48 746.83,-297.43 527.19,-210.48 ; 527.19,195.29 746.82,282.24 527.19,195.29 ; 556.69,-107.89 788.97,-150.87 556.69,-107.89 ; 565.89,-7.6 802.11,-7.6 565.89,-7.6
  lines w10: -772.69,-7.6 ccw(c444.21,31.81) -759.55,-150.87 ; -755.9,135 cw(c-186.05,58.75) -716,281.68 ; -717.41,-297.44 ccw(c295.64,137.94) -644.34,-438.47 ; -644.34,423.28 cw(c-191.53,159.94) -542.07,549.18 ; -542.07,-564.38 ccw(c-140.12,-198.2) -416.16,-666.65 ; -536.47,-7.6 ccw(c-153.96,-23.07) -527.27,-107.89 ; -527.27,92.69 cw(c-233.15,63.67) -497.77,195.29 ; -497.77,-210.49 ccw(c-125.62,-80.3) -446.63,-309.21 ; -446.63,294.01 cw(c-57.43,51) -375.04,382.14 ; -416.17,651.45 cw(c-63.59,129.46) -274.53,723 ; -375.03,-397.34 ccw(c-68.35,-109.85) -286.9,-468.93 ; -286.9,453.74 cw(c14.71,-7.59) -188.18,504.88 ; -128.56,-781.86 ccw(c14.71,-7.6) 157.98,-781.86 ; -85.58,-549.58 ccw(c14.71,-7.59) 115,-549.58 ; 217.59,504.88 cw(c116.04,188) 316.32,453.74 ; 304.55,724.52 cw(c111.16,178.58) 445.58,651.45 ; 316.32,-468.93 ccw(c156.75,-182.46) 404.45,-397.34 ; 404.45,382.15 cw(c202.64,145.06) 476.04,294.01 ; 445.58,-666.65 ccw(c86.18,-95.59) 571.49,-564.37 ; 476.05,-309.21 ccw(c123.7,-64.06) 527.19,-210.48 ; 527.19,195.29 cw(c400.61,118.75) 546.1,92.02 ; 556.69,-107.89 ccw(c231.89,-27.52) 565.89,-7.6 ; 571.48,549.18 cw(c77.35,43.29) 673.76,423.28 ; 673.76,-438.47 ccw(c173.93,-90.08) 746.83,-297.43 ; 746.82,282.24 cw(c-604.69,-185.69) 788.97,135.68 ; 788.97,-150.87 ccw(c-709.99,58.89) 802.11,-7.6
Mechanical 2:
  circle w7.87: c14.71,-7.6 r787.4
  circle w7.87: c14.71,-7.6 r551.18